# Altium PCB Acoustics Board.PcbDoc (part 2 of 3)
Units mil, origin at the board's own origin, x right, y up, seen from the top; angles counter-clockwise.
Board outline 4000 x 4000 mil, 4 copper layers (Top Layer, Middle 1 Layer, Middle 2 Layer, Bottom Layer), stack 53.912 mil thick; 197 components, 130 nets, 610 pads, 658 vias.
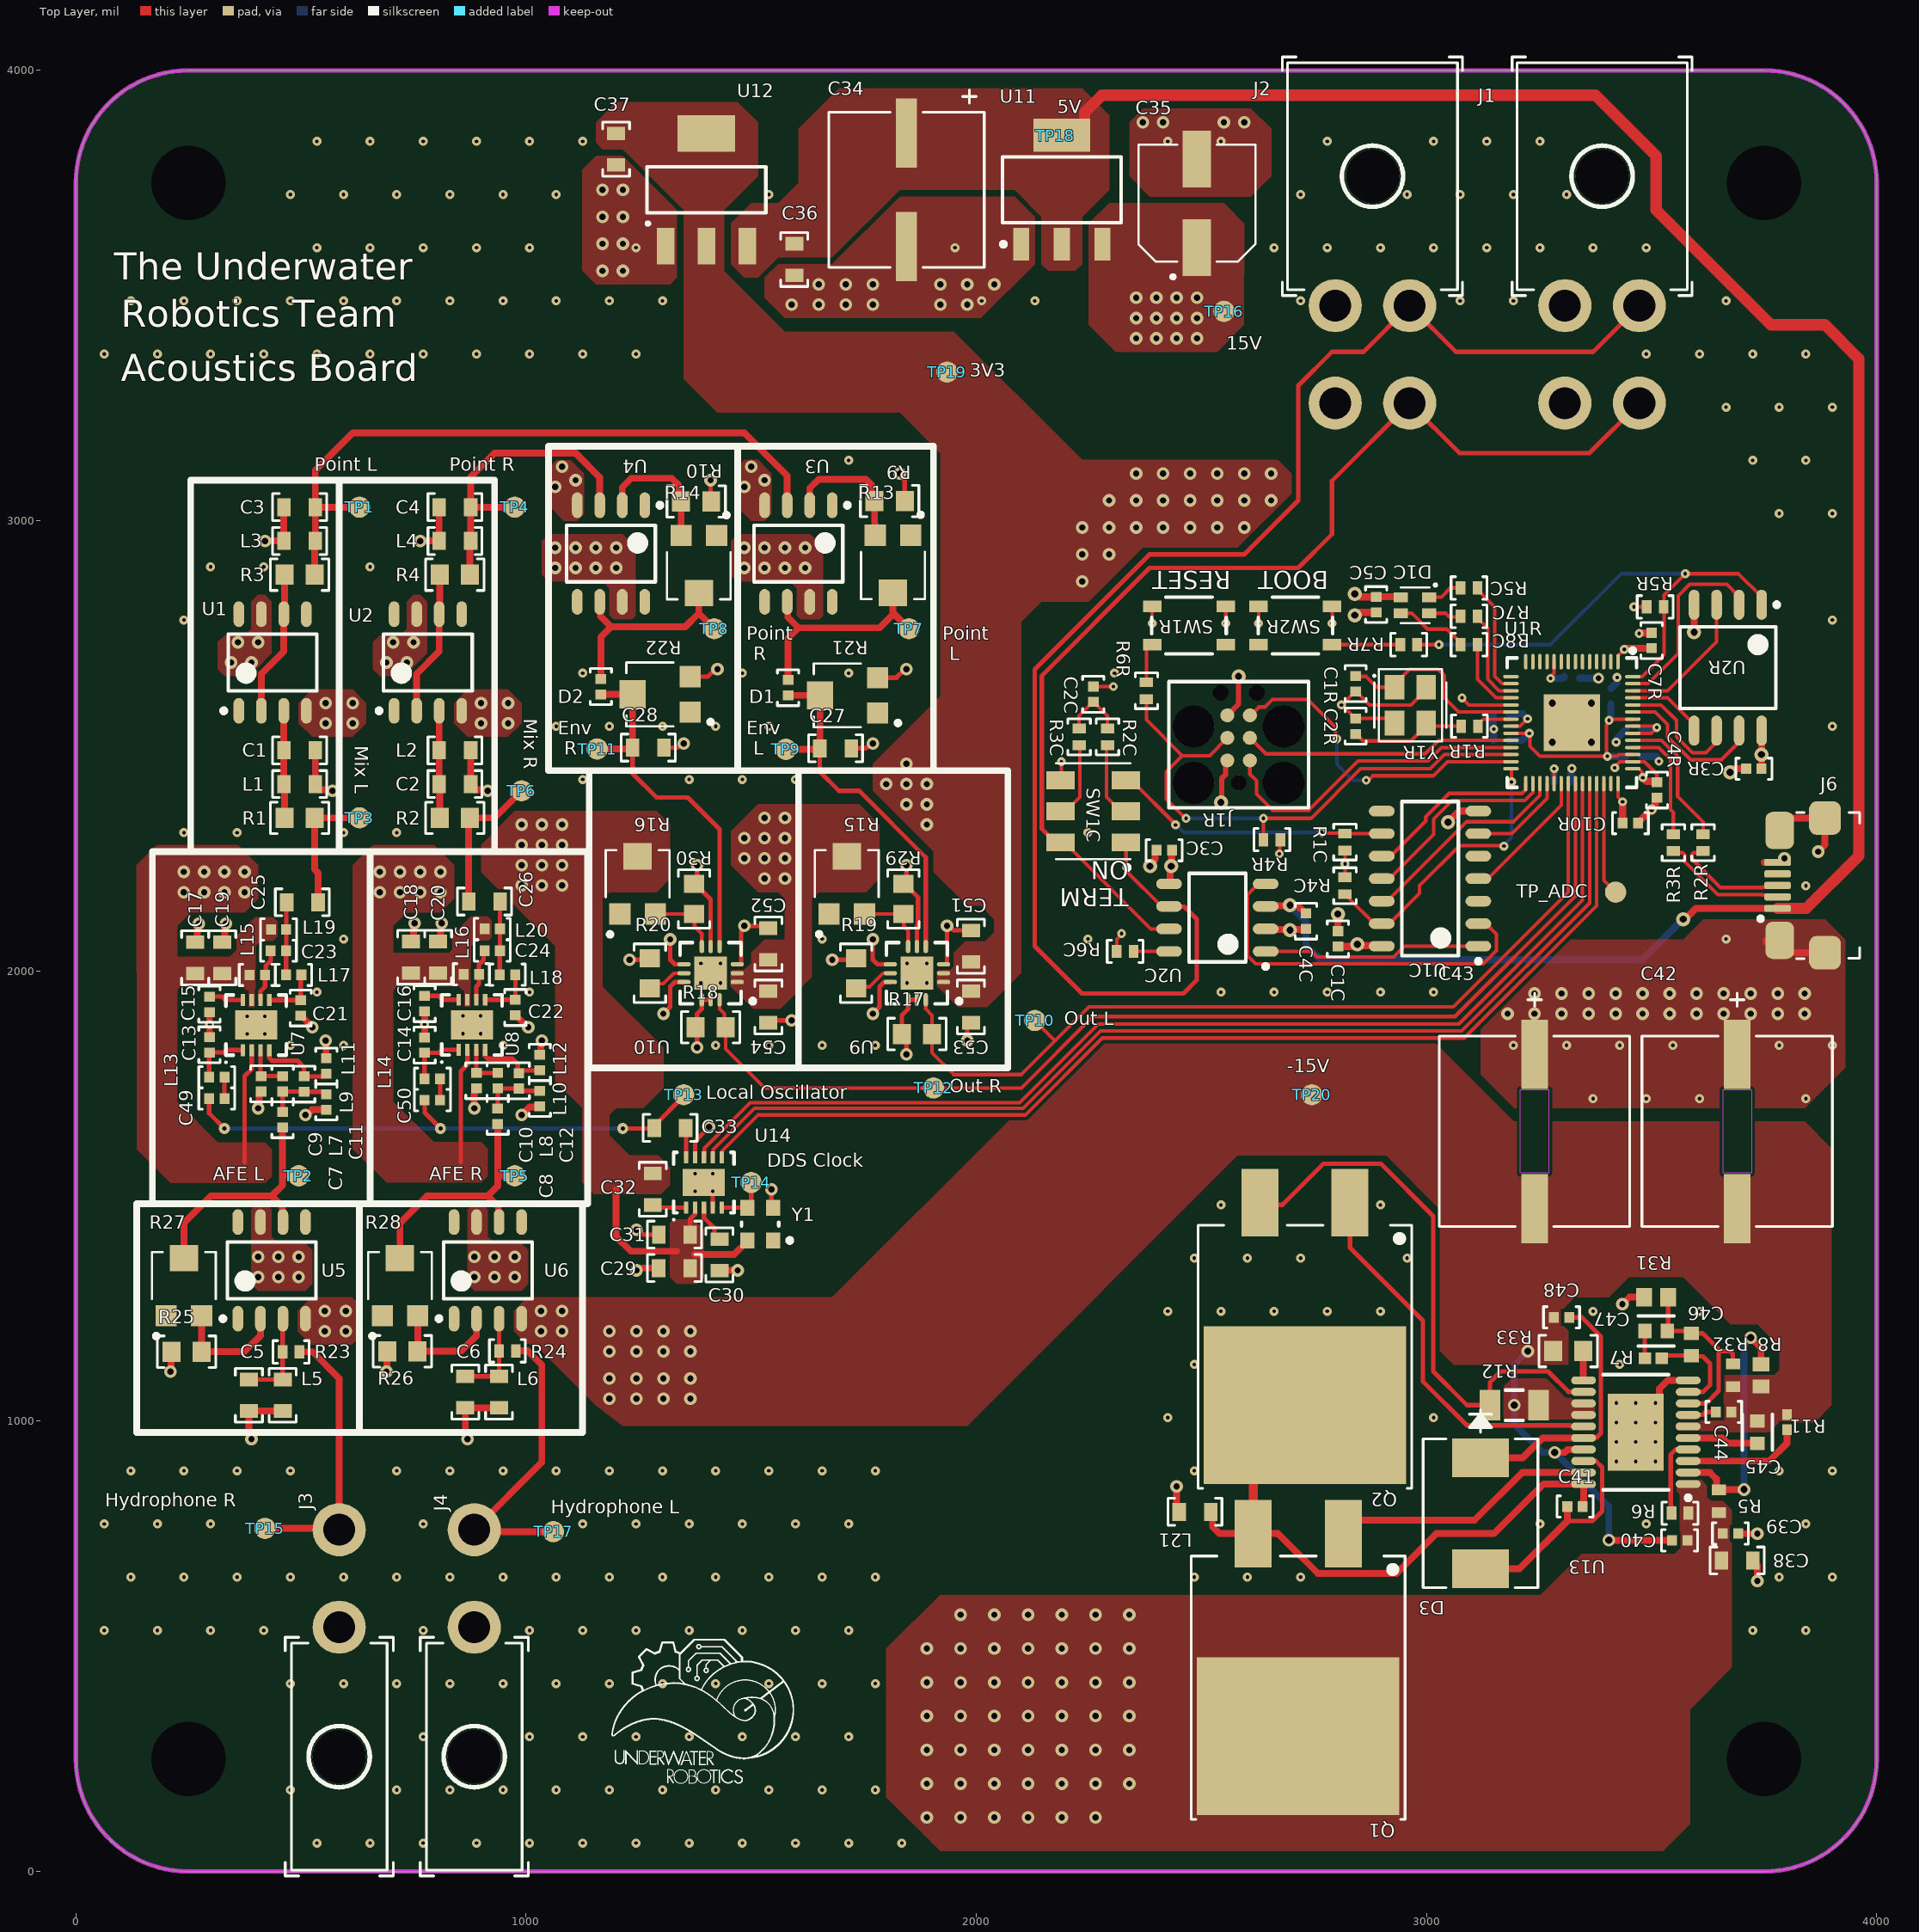
[diagram p0: Top Layer view]

## Part data (continued)
U12: "800-mA 15-V linear voltage regulator 4-SOT-223 -40 to 125", Package="SOT-223-4 Texas Instruments", Arrow_Electronics-Purchase-URL=https://snapeda.com/shop?store=Arrow+Electronics&id=410186, Availability=Good, DigiKey-Purchase-URL=https://snapeda.com/shop?store=DigiKey&id=410186, MF="Texas Instruments", Mouser-Purchase-URL=https://snapeda.com/shop?store=Mouser&id=410186, MP=LM1117IMPX-3.3/NOPB, Price=None, SnapEDA_Link=https://www.snapeda.com/parts/LM1117IMPX-3.3/NOPB/Texas%20Instruments/view-part/410186/?ref=snap, Texas_Instruments-Purchase-URL=https://snapeda.com/shop?store=Texas+Instruments&id=410186
U13: "IC REG CTRLR BUCK 20TSSOP"
U14: library part AD9837ACPZ, "Direct Digital Synthesis IC 10 b 5 MHz 28 b Tuning 10-LFCSP-WD (3x3)"
Y1: library part CMP-40224-000034-1, "XTAL OSC TCXO 25.0000MHZ HCMOS", RoHS Compliant=Yes
Y1R: library part CRYSTAL_12MHz_SMD_SMALL, "12 MHz ±20ppm Crystal 18pF 100 Ohms 4-SMD, No Lead (3.2x2.5mm)", Frequency="12 MHz", Load Capacitance=18pF, Supplier Part Number 1=2151-RH100-12.000-18-2030-EXT-TRCT-ND, ESR="100 Ohms", Made By="Robert Pafford", Supplier 1=Digi-Key

## Free pads (board coordinates)
  round 0 hole 165 unplated: 1(250,250) 1(250,3750) 1(3750,250) 1(3750,3750)

## Via types
v1: diameter 28, hole 14, Top Layer to Bottom Layer, tented both sides, 299 vias
v2: diameter 20.08/20.08/20.08/20.08 (per signal layer), hole 8.07, Top Layer to Bottom Layer, tented both sides, 256 vias
v3: diameter 19.68, hole 7.87, Top Layer to Bottom Layer, tented both sides, 71 vias
v4: diameter 31.5, hole 15.75, Top Layer to Bottom Layer, tented both sides, 19 vias
v5: diameter 28, hole 16, Top Layer to Bottom Layer, tented both sides, 6 vias
v6: diameter 24, hole 10, Top Layer to Bottom Layer, tented both sides, 3 vias
v7: diameter 20, hole 9, Top Layer to Bottom Layer, tented both sides, 2 vias
v8: diameter 23.62, hole 11.81, Top Layer to Bottom Layer, tented both sides, 2 vias

## Nets (pads, with @x,y where several pads share a name; then routed paths per layer and width w, separated by ;. In a path a pad name is that pad's centre, name@x,y a point inside that pad or via, vN(x,y) a via of type N, cw(c..) or ccw(c..) an arc to the next point about the centre after c; other vN are vias at no path point)
1v1_RP2040: C11R.1 C12R.1 C13R.1 U1R.23 U1R.45 U1R.50 | length 579.4
  Top Layer w7.87: U1R.23@3187.5,2527.83 v3(3228.35,2527.83) 3229.49,2526.69 3229.49,2499.14 3251.97,2476.65 v3(3401.57,2476.65) ; U1R.45@3458.17,2480.59 3427.17,2480.59 3423.23,2476.65 v3(3401.57,2476.65) ; U1R.50@3458.17,2559.33 3411.4,2559.33 3408.71,2556.64 v3(3405.51,2556.64) 3405.51,2553.44 3399.61,2547.53 3399.61,2478.62 v3(3401.57,2476.65)
  Bottom Layer w15.75: C12R.1@3182.48,2512.09 3212.6,2512.09 v3(3228.35,2527.83) ; v3(3401.57,2476.65) C11R.1@3443.5,2476.65 ; v3(3405.51,2556.64) 3405.51,2557.7 3409.45,2561.64 C13R.1@3409.45,2593.39
3V3: C1C.1 C3C.1 C3R.1 C4R.1 C5C.1 C5R.1 C6R.1 C7R.1 C8R.1 C9R.1 C10R.1 C17.2 C18.2 C19.2 C20.2 C29.2 C31.1 C32.1 C37.1 C51.1 C52.1 C53.1 C54.1 D1C.4 J1R.2 L15.1 L16.1 L19.1 L20.1 R1C.1 R4C.1 R4R.1 R5R.1 R15.2 R16.2 TP19.TP U1C.14 U1R.1 U1R.10 U1R.22 U1R.33 U1R.42 U1R.43 U1R.44 U1R.48 U1R.49 U2C.5 U2R.8 U7.2 U7.7 U8.2 U8.7 U9.1 U9.2 U10.1 U10.2 U12.2 U12.4 U14.2 Y1.4 | length 2310
  Top Layer w7.87: v3(2673.23,2260.12) 2674.21,2261.1 2674.21,2290.63 R4R.1@2675.2,2291.61 ; C1C.1@2803.15,2054.02 C1C.1@2803.64,2054.51 ; R4C.1@2818.9,2207.95 v3(2818.9,2237.78) R1C.1@2818.9,2267.6 ; v3(3275.59,2649.88) 3275.59,2653.08 3283.46,2660.95 U1R.10@3283.46,2686.79 ; U1R.33@3283.46,2416.12 v3(3283.46,2449.09) ; v3(3418.05,2451.06) 3418.05,2453.76 3429.13,2464.84 U1R.44@3458.17,2464.84 3484.25,2464.84 3511.81,2437.28 C4R.1@3511.81,2418.98 ; U1R.42@3425.2,2416.12 3425.2,2386.1 v3(3435.63,2375.67) ; U1R.1@3425.2,2686.79 3425.2,2700.08 v3(3439.23,2714.12) ; U1R.43@3458.17,2449.09 3471.46,2449.09 3478.81,2441.74 v3@3478.81,2430.92 ; U1R.48@3458.17,2527.83 3498.76,2527.83 v3(3511.51,2540.59) 3511.81,2540.89 3508.02,2540.89 3505.32,2543.58 U1R.49@3458.17,2543.58 ; v3(3460.63,2808.6) R5R.1@3489.17,2808.6
  Top Layer w8: U1R.22@3187.5,2543.58 3187.56,2543.65 3207.97,2543.65 v3(3224.41,2560.09)
  Top Layer w9.84: D1C.4@2942.94,2831.01 D1C.4@2943.23,2831.3
  Top Layer w10: 375,1575 375,1766.43 390.47,1781.91 U7.2@390.47,1823.98 ; 855,1575 855,1777.35 869.74,1792.09 U8.2@869.74,1824.55 ; C31.1@1364.68,1414.29 1364.68,1449.48 1375.31,1460.11 U14.2@1375.31,1474.29
  Top Layer w11.81: v4(2543.31,2374.29) 2545.08,2376.07 2545.08,2427.25 2554.01,2436.17 2554.01,2463.93 J1R.2@2557.68,2467.6
  Top Layer w15: 1200,1515 1200,1410 1232.7,1377.3 1335,1377.3 ; 1374.49,1370.09 1461.95,1370.09 1491.25,1399.39 Y1.4@1491.25,1401.36
  Top Layer w15.75: U2C.5@2428.15,2193.39 2430.61,2195.85 2430.61,2230.1 v4(2433.07,2232.56) 2433.76,2233.25 2433.76,2267.3 C3C.1@2434.45,2267.99 ; C1C.1@2803.64,2054.51 2837.37,2054.51 2842.2,2059.33 v4(2846.46,2059.33) 2849.28,2056.51 2898.1,2056.51 U1C.14@2900.1,2054.51 ; v4(2840.87,2837.21) 2845.13,2837.21 2851.63,2830.71 C5C.1@2888.11,2830.71 ; C5C.1@2890.52,2831.01 D1C.4@2942.94,2831.01 ; C10R.1@3435.63,2328.29 v3(3435.63,2375.67) ; v3(3439.23,2714.12) 3440.3,2714.12 3442.86,2716.67 C7R.1@3500,2716.67 ; v3(3480.31,2429.41) 3488.91,2420.82 3509.97,2420.82 C4R.1@3511.81,2418.98 ; C3R.1@3744.29,2449.09 U2R.8@3744.29,2533.8
  Bottom Layer w15.75: C8R.1@3182.48,2571.25 3213.37,2571.25 3224.41,2560.2 v3(3224.41,2560.09) ; v3(3275.59,2649.88) 3302.56,2649.88 3305.71,2653.03 C6R.1@3305.71,2653.82 ; C9R.1@3283.46,2417.6 v3(3283.46,2449.09) ; C5R.1@3477.76,2536.95 3506.81,2536.95 3510.45,2540.59 v3(3511.51,2540.59)
  other v1: 240,2175 285,2175 330,2175 375,2175 675,2175 720,2175 765,2175 810,2175 990,2190 1035,2190 1080,2190 1530,2205 1575,2205 240,2220 285,2220 330,2220 375,2220 675,2220 720,2220 765,2220 810,2220 990,2235 1035,2235 1080,2235 1485,2250 1530,2250 1575,2250 990,2280 1035,2280 1080,2280 1485,2295 1530,2295 1575,2295 990,2325 1035,2325 1080,2325 1890,2325 1530,2340 1575,2340 1845,2370 1890,2370 1800,2415 1845,2415 1890,2415 1845,2460 2235,2865 2235,2925 2295,2925 2235,2985 2295,2985 2355,2985 2415,2985 2475,2985 2535,2985 2595,2985 2295,3045 2355,3045 2415,3045 2475,3045 2535,3045 2595,3045 2655,3045 2355,3105 2415,3105 2475,3105 2535,3105 2595,3105 2655,3105
  other v4: 3744.09,2480.59
5V: C4C.1 C34.1 C36.1 J6.1 TP18.TP U2C.3 U11.2 U12.3 | length 4757.8
  Top Layer w15.75: U2C.3@2642.72,2143.39 2644,2144.67 2695.57,2144.67 v4(2696.85,2145.94) ; 2716.2,2142.93 2728.35,2130.79 2729.13,2130.79 C4C.1@2732.28,2127.64 ; v4(3570,2115) 3574.26,2115 3598.08,2138.82 J6.1@3779.69,2138.82
  Top Layer w25: U11.2@2190,3856.06 2216.57,3856.06 2240.49,3879.98 2240.49,3906.56 2278.94,3945 3375,3945 3510,3810 3510,3690 3765,3435 3885,3435 3960,3360 3960,2255.26 3843.56,2138.82 J6.1@3779.69,2138.82
  Bottom Layer w15.75: v4(2696.85,2145.94) 2732.28,2110.51 2732.28,2056.16 2763.45,2025 3480,2025 v4(3570,2115)
15V: C35.1 C38.1 C39.1 C40.1 J1.3 J2.3 Q1.3 R5.1 R6.1 TP16.TP U1.7 U2.7 U3.7 U4.7 U5.7 U6.7 U11.3 U13.1
  other v1: 1890,120 1965,120 2040,120 2115,120 2190,120 2265,120 1890,195 1965,195 2040,195 2115,195 2190,195 2265,195 2340,195 1890,270 1965,270 2040,270 2115,270 2190,270 2265,270 2340,270 1890,345 1965,345 2040,345 2115,345 2190,345 2265,345 2340,345 1890,420 1965,420 2040,420 2115,420 2190,420 2265,420 2340,420 1890,495 1965,495 2040,495 2115,495 2190,495 2265,495 2340,495 1965,570 2040,570 2115,570 2190,570 2265,570 2340,570 405,1320 450,1320 495,1320 885,1320 930,1320 975,1320 405,1365 450,1365 495,1365 885,1365 930,1365 975,1365 345,2685 390,2685 690,2685 735,2685 360,2730 405,2730 705,2730 750,2730 1065,2895 1110,2895 1155,2895 1200,2895 1485,2895 1530,2895 1575,2895 1620,2895 1065,2940 1110,2940 1155,2940 1200,2940 1485,2940 1530,2940 1575,2940 1620,2940 2355,3405 2400,3405 2445,3405 2490,3405 2355,3450 2400,3450 2445,3450 2490,3450 2355,3495 2400,3495 2445,3495 2490,3495
-15V: C40.2 C42.2 C43.2 C44.2 C45.2 C48.2 R8.1 R11.1 R12.1 R32.2 R33.2 TP20.TP U1.4 U2.4 U3.4 U4.4 U5.4 U6.4 U13.6 U13.13 U13.14 U13.17 | length 742.2
  Top Layer w15: v5(3284.96,930.51) 3307.03,930.51 3313.12,936.61 3348.3,936.61 U13.17@3348.82,937.13 ; v5(3404.96,735.51) 3533.97,735.51 3534.08,735.4 C40.2@3545.11,735.4
  Bottom Layer w15: v5(3224.96,1155.51) 3194.96,1125.51 v5(3194.96,1035.51) 3194.96,993.26 3257.71,930.51 v5(3284.96,930.51) 3404.96,810.51 v5(3404.96,735.51)
  other v1: 1185,1050 1245,1050 1305,1050 1365,1050 1185,1095 1245,1095 1305,1095 1365,1095 1185,1155 1245,1155 1305,1155 1365,1155 553,1200 600,1200 1033,1200 1080,1200 1185,1200 1245,1200 1305,1200 1365,1200 553,1245 600,1245 1033,1245 1080,1245 555,2550 615,2550 900,2550 960,2550 555,2595 615,2595 900,2595 960,2595 1065,3075 1485,3075 1110,3090 1530,3090 1080,3120 1500,3120
CANCLK_RP2CAN: U1C.6 U1R.32 | length 217.8
  Top Layer w7.87: U1C.6@3115.16,2305 3189.45,2305 3267.72,2383.27 U1R.32@3267.72,2416.12
CANH_RP2CAN: J1.4 J2.4 SW1C.4 U2C.7 | length 2472.8
  Top Layer w7.87: SW1C.4@2187.01,2285.71 2198.82,2285.71 2214.57,2269.96 2214.57,2266.61 2387.8,2093.39 U2C.7@2428.15,2093.39 U2C.7@2444.88,2093.39
  Top Layer w10: SW1C.4@2187.01,2285.71 2175.2,2285.71 2145.51,2315.39 2145.51,2655.51 2385,2895 2715,2895 2790,2970 2790,3088.39 J2.4@2962.68,3261.06 3073.74,3150 3361.61,3150 J1.4@3472.68,3261.06